# Altium PCB EEM_FMC_Carrier.PcbDoc (part 19 of 19)
Units mm, origin at the board's own origin, x right, y up, seen from the top; angles counter-clockwise.
Board outline 222.9 x 100 mm, 6 copper layers (TopLayer, MidLayer1, MidLayer2, SignalLayer1, Internal Plane 1, BottomLayer), stack 1.528 mm thick; 790 components, 743 nets, 3570 pads, 2277 vias.
Unrouted connection lines stored in the file: 3.
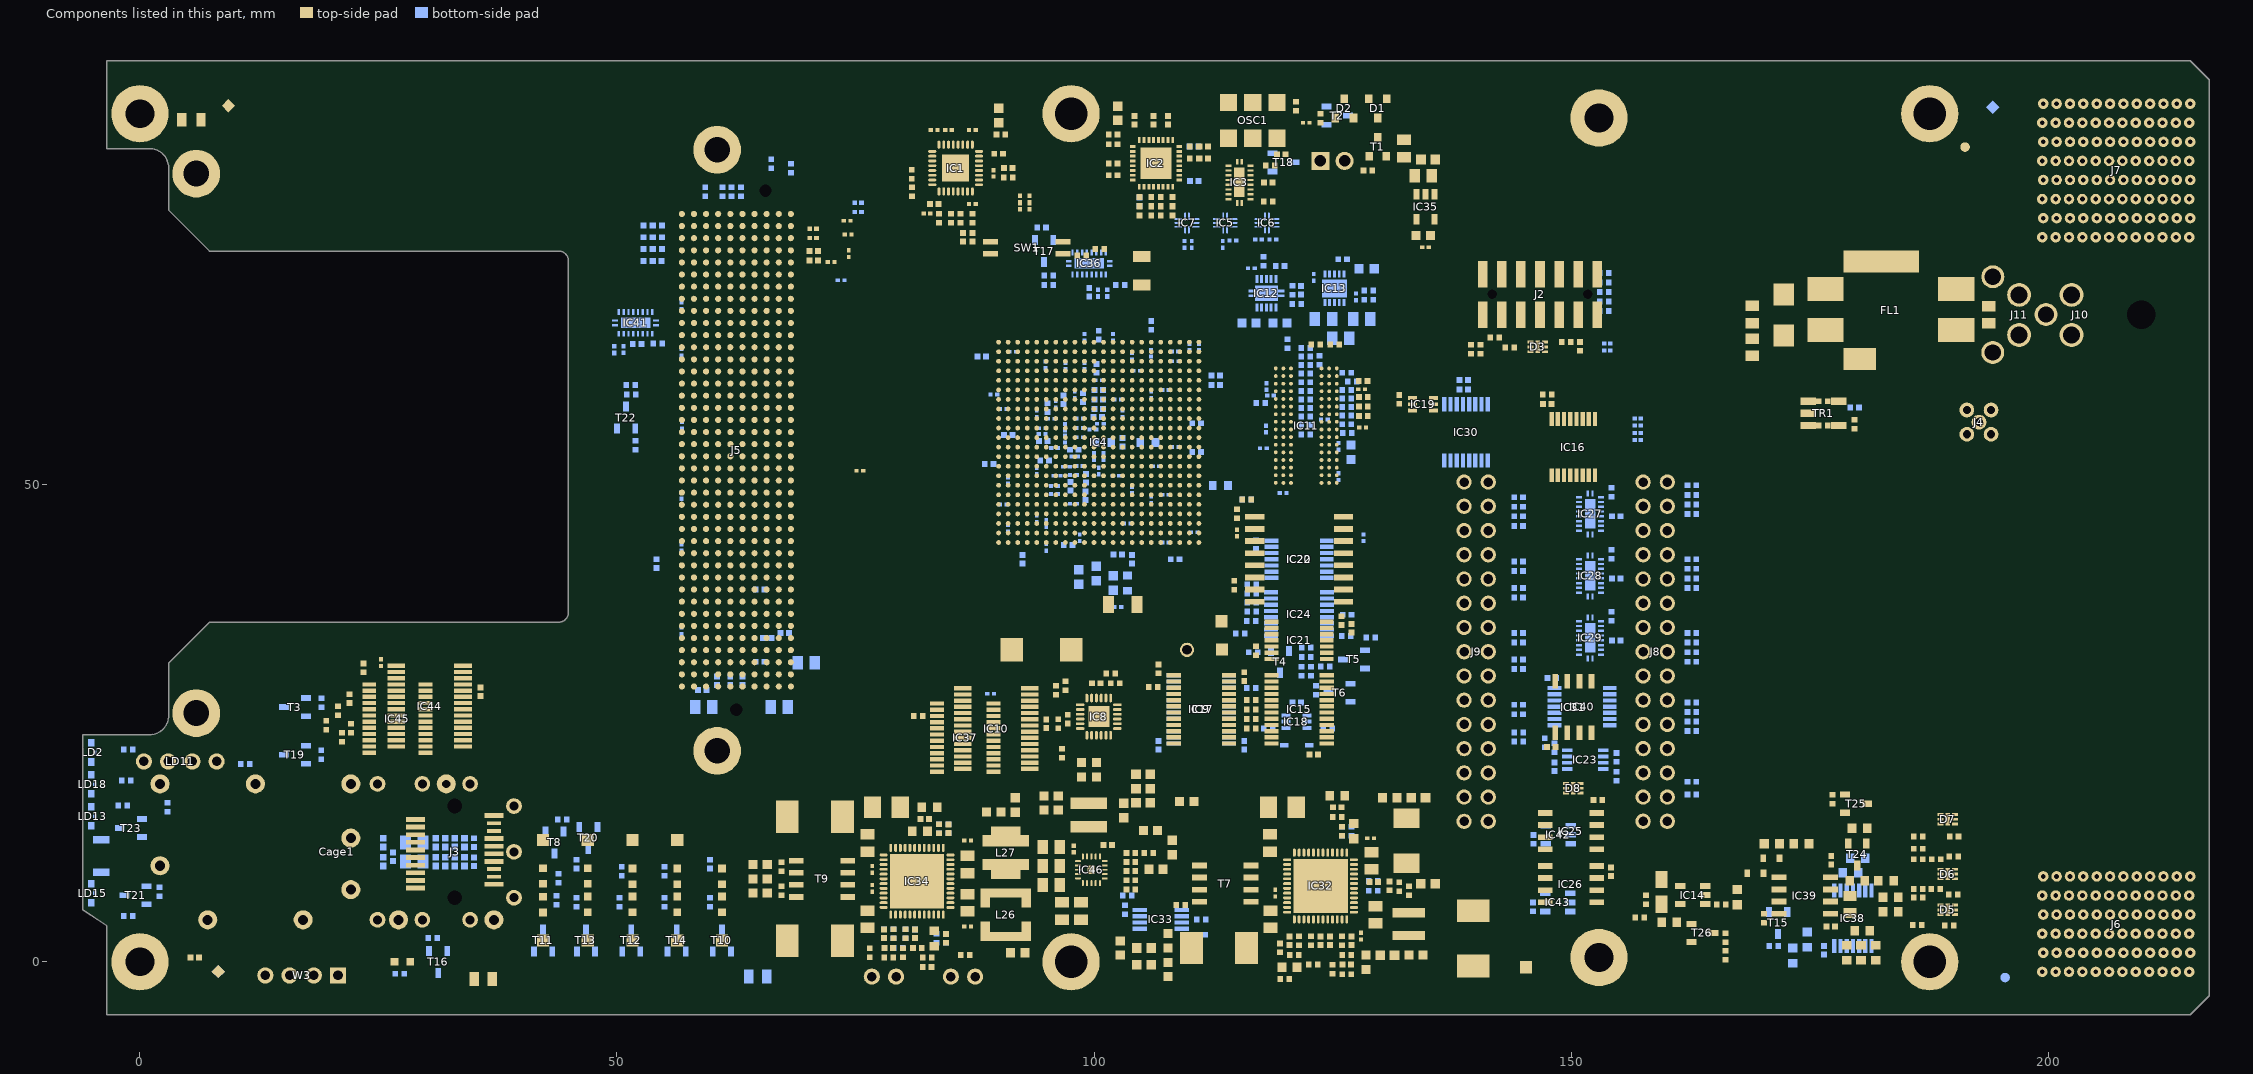
[diagram p21: the components of this part, seen from the top]

## Silkscreen, mask and mechanical layers (free items; w line width, h text height)
TopOverlay:
  drawing of 290 lines, arcs and shapes, not listed
  text "EEM FMC Carrier v1.2" at 20.681,81.884 h1.5
  text "WUT ISE 2025" at 29.366,79.196 h1.02
  text "Designed by Pawel Kulik" at 28.5,77.5 h0.6
  text "<-Off | On->" at 87.45,70.95 h1
  text "FPGA / JTAG" at 133.998,67.2 h1
  text "SW1  /  1 / Off / Off / On / On" at 71.75,62.25 h1
  text "2 / Off / On / Off / On" at 75.75,62.25 h1
  text "CLK SRC / BP / OSC / MMCX / N/C" at 79.5,62.25 h1
  text "INT CLK IN" at 195.825,56 h1
  text "EEM 0" at 158.05,55.625 h1
  text "EEM 1" at 139.575,55.6 h1
  text "SDA" at 114.7,35.85 h0.91
  text "SPI" at 114.85,33.5 h0.91
  text "GND" at 105.248,31.95 h1
  text "SCL" at 114.475,30.7 h0.9
  text "VADJ setting: / W1 shorted: 1.8V / W2 shorted: 2.5V / Both shorted: 3.3V / Both open: Not supported" at 74.55,29.525 h0.8
  text "Licensed under CERN-OHL-W v2 or later / https://ohwr.org/cernohl / https://github.com/sinara-hw/EEM_FMC_Carrier" at 53.551,27.227 h1.2 r90
  text "P3V3" at 56.812,14.2 h1 r90
  text "PGOOD / FMC" at 43.75,14 h1 r90
  text "VADJ / FMC" at 48.477,14 h1 r90
  text "P3V3 / FMC" at 53.165,14 h1 r90
  text "P12V0" at 61.7,14 h1 r90
  text "GND" at 11.398,0.8 h1
  text "TX" at 14.648,0.8 h1
  text "RX" at 17.398,0.8 h1
  text "P3V3" at 19.898,0.8 h1
  text "P12V0" at 143.475,0.625 h1
  text "FPGA DONE" at 29.75,-1.5 h1
  text "P1V0" at 43,-3 h1 r90
  text "P1V2" at 47.637,-3 h1 r90
  text "P1V5" at 52.325,-3 h1 r90
  text "P1V8" at 57.012,-3 h1 r90
  text "P2V5" at 61.77,-3 h1 r90
BottomOverlay:
  drawing of 262 lines, arcs and shapes, not listed
  text "EEM FMC Carrier v1.2" at 38.368,80.1 h1.5
  text "WUT ISE 2025" at 29.307,77.873 h1.02
  text "Licensed under CERN-OHL-W v2 or later / https://ohwr.org/cernohl / https://github.com/sinara-hw/EEM_FMC_Carrier" at 58.223,27.799 h1.2
TopSolder:
  rectangle: -2.379,-4.947 -0.202,-3.15
  rectangle: -0.202,-4.947 1.975,-3.175
  rectangle: 1.448,-4.947 216.417,-3.225
  region: 202.467,46.205 202.467,42.705 216.43,42.705 216.43,46.205
BottomSolder:
  rectangle: -2.379,-4.947 -0.202,-3.15
  rectangle: -0.202,-4.947 1.975,-3.175
  rectangle: 1.367,-4.947 216.417,-3.2
  region: 202.467,46.205 202.467,42.705 216.43,42.705 216.43,46.205
Mechanical 1:
  lines w0.15: 7.273,74.5 43.898,74.5 cw(c43.898,73.5) 44.898,73.5 44.898,36.6 cw(c43.898,36.6) 43.898,35.6 7.298,35.6 2.998,31.3 2.998,25.8 cw(c0.998,25.8) 0.998,23.8 -3.002,23.8 -6,23.8 -6,5.45 -3.5,3.8 -3.5,-5.55 214.9,-5.55 216.9,-3.55 216.9,92.45 214.9,94.45 -3.5,94.45 -3.5,85.25 0.998,85.25 cw(c0.998,83.25) 2.998,83.25 2.998,78.8 7.298,74.5
  lines w0.381: 50.863,111.387 61.275,111.387 87.176,111.387 109.014,111.387 125.52,111.387 139.994,111.387 151.93,111.387 ; 50.863,114.435 61.275,114.435 87.176,114.435 109.014,114.435 125.52,114.435 139.994,114.435 151.93,114.435 ; 50.863,117.483 61.275,117.483 87.176,117.483 109.014,117.483 125.52,117.483 139.994,117.483 151.93,117.483 ; 50.863,120.531 61.275,120.531 87.176,120.531 109.014,120.531 125.52,120.531 139.994,120.531 151.93,120.531 ; 50.863,123.579 61.275,123.579 87.176,123.579 109.014,123.579 125.52,123.579 139.994,123.579 151.93,123.579 ; 50.863,126.627 61.275,126.627 87.176,126.627 109.014,126.627 125.52,126.627 139.994,126.627 151.93,126.627 ; 50.863,129.675 61.275,129.675 87.176,129.675 109.014,129.675 125.52,129.675 139.994,129.675 151.93,129.675 ; 50.863,132.723 61.275,132.723 87.176,132.723 109.014,132.723 125.52,132.723 139.994,132.723 151.93,132.723 ; 50.863,135.771 61.275,135.771 87.176,135.771 109.014,135.771 125.52,135.771 139.994,135.771 151.93,135.771 ; 50.863,138.819 61.275,138.819 87.176,138.819 109.014,138.819 125.52,138.819 139.994,138.819 151.93,138.819 ; 50.863,141.867 61.275,141.867 87.176,141.867 109.014,141.867 125.52,141.867 139.994,141.867 151.93,141.867 ; 50.863,144.915 61.275,144.915 87.176,144.915 109.014,144.915 125.52,144.915 139.994,144.915 151.93,144.915 ; 50.863,147.963 61.275,147.963 87.176,147.963 109.014,147.963 125.52,147.963 139.994,147.963 151.93,147.963 ; 50.863,151.011 61.275,151.011 87.176,151.011 109.014,151.011 125.52,151.011 139.994,151.011 151.93,151.011 ; 50.863,154.059 151.93,154.059 ; 61.275,157.107 61.275,108.339 ; 87.176,157.107 87.176,108.339 ; 109.014,157.107 109.014,108.339 ; 125.52,157.107 125.52,108.339 ; 139.994,157.107 139.994,108.339 ; 61.275,108.339 87.176,108.339 ; 61.275,108.339 50.863,108.339 50.863,157.107 151.93,157.107 151.93,108.339 139.994,108.339 ; 87.176,108.339 109.014,108.339 ; 109.014,108.339 125.52,108.339 ; 125.52,108.339 139.994,108.339
  text "Layer" at 52.641,154.821 h1.52
  text "Name" at 63.053,154.821 h1.52
  text "Material" at 88.954,154.821 h1.52
  text "Thickness" at 110.792,154.821 h1.52
  text "Constant" at 127.298,154.821 h1.52
  text "Gerber" at 141.772,154.821 h1.52
  text "TopOverlay" at 63.053,151.773 h1.52
  text "GTO" at 141.772,151.773 h1.52
  text "TopSolder" at 63.053,148.725 h1.52
  text "Solder Resist" at 88.954,148.725 h1.52
  text "0.022mm" at 110.792,148.725 h1.52
  text "3.5" at 127.298,148.725 h1.52
  text "GTS" at 141.772,148.725 h1.52
  text "1" at 52.641,145.677 h1.52
  text "TopLayer" at 63.053,145.677 h1.52
  text "0.053mm" at 110.792,145.677 h1.52
  text "GTL" at 141.772,145.677 h1.52
  text "Dielectric1" at 63.053,142.629 h1.52
  text "FR-4" at 88.954,142.629 h1.52
  text "0.110mm" at 110.792,142.629 h1.52
  text "4.2" at 127.298,142.629 h1.52
  text "2" at 52.641,139.581 h1.52
  text "MidLayer1" at 63.053,139.581 h1.52
  text "0.018mm" at 110.792,139.581 h1.52
  text "G1" at 141.772,139.581 h1.52
  text "Dielectric2" at 63.053,136.533 h1.52
  text "FR-4" at 88.954,136.533 h1.52
  text "0.200mm" at 110.792,136.533 h1.52
  text "4.2" at 127.298,136.533 h1.52
  text "3" at 52.641,133.485 h1.52
  text "MidLayer2" at 63.053,133.485 h1.52
  text "0.018mm" at 110.792,133.485 h1.52
  text "G2" at 141.772,133.485 h1.52
  text "Dielectric3" at 63.053,130.437 h1.52
  text "FR-4" at 88.954,130.437 h1.52
  text "0.730mm" at 110.792,130.437 h1.52
  text "4.2" at 127.298,130.437 h1.52
  text "4" at 52.641,127.389 h1.52
  text "SignalLayer1" at 63.053,127.389 h1.52
  text "0.018mm" at 110.792,127.389 h1.52
  text "G3" at 141.772,127.389 h1.52
  text "Dielectric4" at 63.053,124.341 h1.52
  text "FR-4" at 88.954,124.341 h1.52
  text "0.200mm" at 110.792,124.341 h1.52
  text "4.2" at 127.298,124.341 h1.52
  text "5" at 52.641,121.293 h1.52
  text "Internal Plane 1" at 63.053,121.293 h1.52
  text "0.018mm" at 110.792,121.293 h1.52
  text "GP1" at 141.772,121.293 h1.52
  text "Dielectric5" at 63.053,118.245 h1.52
  text "FR-4" at 88.954,118.245 h1.52
  text "0.110mm" at 110.792,118.245 h1.52
  text "4.2" at 127.298,118.245 h1.52
  text "6" at 52.641,115.197 h1.52
  text "BottomLayer" at 63.053,115.197 h1.52
  text "0.053mm" at 110.792,115.197 h1.52
  text "GBL" at 141.772,115.197 h1.52
  text "BottomSolder" at 63.053,112.149 h1.52
  text "Solder Resist" at 88.954,112.149 h1.52
  text "0.022mm" at 110.792,112.149 h1.52
  text "3.5" at 127.298,112.149 h1.52
  text "GBS" at 141.772,112.149 h1.52
  text "BottomOverlay" at 63.053,109.101 h1.52
  text "GBO" at 141.772,109.101 h1.52
  text "Total board thickness:" at 52.641,106.053 h1.52
  text "1.572mm" at 110.792,106.053 h1.52
  text "All vias must be fileld with resin and capped with copper" at 45.138,101.546 h3
Mechanical 2:
  lines w0.1: -6.114,-19.788 -6.114,102.894
Mechanical 13:
  lines w0.01: -6.352,-6.334 -6.352,75.374
Mechanical 15:
  lines w0.1: 87.498,39.2 113.498,39.2 113.498,69.7 87.498,69.7 87.498,39.2
Mechanical 17:
  drawing of 154 lines, arcs and shapes, not listed

## Text inside footprints (layer, text, board x,y; h text height)
Cage1: Drill Drawing "1x diam. 0.85mm +/-0.05" at 1.6,16.025 h1; Drill Drawing "9x diam. 0.95mm +/-0.05" at 1.4,11.925 h1; Drill Drawing "10x diam. 1.05mm +/-0.05" at 0.8,14.15 h1; Drill Drawing "PRESS-FIT TECHNOLOGY" at 3.6,9.725 h1
IC11: Mechanical 14 "L" at 126.848,58.4 h0.4 r180; Mechanical 14 "K" at 126.848,57.6 h0.4 r180; Mechanical 14 "M" at 126.848,59.2 h0.4 r180; Mechanical 14 "H" at 126.848,56 h0.4 r180; Mechanical 14 "G" at 126.848,55.2 h0.4 r180; Mechanical 14 "F" at 126.848,54.4 h0.4 r180; Mechanical 14 "E" at 126.848,53.6 h0.4 r180; Mechanical 14 "D" at 126.848,52.8 h0.4 r180; Mechanical 14 "C" at 126.848,52 h0.4 r180; Mechanical 14 "B" at 126.848,51.2 h0.4 r180; Mechanical 14 "N" at 126.848,60 h0.4 r180; Mechanical 14 "P" at 126.848,60.8 h0.4 r180; Mechanical 14 "R" at 126.848,61.6 h0.4 r180; Mechanical 14 "J" at 126.848,56.8 h0.4 r180; Mechanical 14 "T" at 126.848,62.4 h0.4 r180; Mechanical 14 "1" at 125.573,48.925 h0.4 r180; Mechanical 14 "2" at 124.773,48.925 h0.4 r180; Mechanical 14 "3" at 123.973,48.925 h0.4 r180; Mechanical 14 "7" at 120.773,48.925 h0.4 r180; Mechanical 14 "8" at 119.973,48.925 h0.4 r180; Mechanical 14 "9" at 119.173,48.925 h0.4 r180
J1: TopOverlay "1" at 123.508,85.348 h1; Mechanical 14 "1" at 123.508,85.348 h1
J5: TopOverlay "1" at 69.951,78.914 h1 r180; TopOverlay "40" at 67.974,27.335 h1.2 r180; TopOverlay "k" at 56.997,83.613 h1 r180; TopOverlay "j" at 58.248,83.125 h1 r180; TopOverlay "g" at 60.923,88.55 h1 r180; TopOverlay "h" at 59.598,88.8 h1 r180; TopOverlay "f" at 62.073,88.625 h1 r180; TopOverlay "a" at 68.609,83.596 h1 r180; TopOverlay "b" at 67.339,83.596 h1 r180; TopOverlay "c" at 66.069,83.596 h1 r180; TopOverlay "d" at 64.905,83.613 h1 r180; TopOverlay "e" at 63.349,83.573 h1 r180; Mechanical 14 "1" at 69.951,78.914 h1 r180; Mechanical 14 "40" at 67.974,27.335 h1.2 r180; Mechanical 14 "k" at 56.997,83.613 h1 r180; Mechanical 14 "j" at 58.267,83.613 h1 r180; Mechanical 14 "g" at 60.934,83.486 h1 r180; Mechanical 14 "h" at 59.592,83.596 h1 r180; Mechanical 14 "f" at 62.077,83.74 h1 r180; Mechanical 14 "e" at 63.349,83.573 h1 r180; Mechanical 14 "d" at 64.905,83.613 h1 r180; Mechanical 14 "c" at 66.069,83.596 h1 r180; Mechanical 14 "b" at 67.339,83.596 h1 r180; Mechanical 14 "a" at 68.609,83.596 h1 r180
J6: TopOverlay "6" at 194.85,8.6 h1 r90; TopOverlay "5" at 194.85,6.6 h1 r90; TopOverlay "4" at 194.85,4.6 h1 r90; TopOverlay "3" at 194.85,2.6 h1 r90; TopOverlay "2" at 194.85,0.6 h1 r90; TopOverlay "1" at 194.85,-1.4 h1 r90; TopOverlay "L" at 199.9,-3.25 h1 r90; TopOverlay "K" at 201.3,-3.25 h1 r90; TopOverlay "J" at 202.7,-3.25 h1 r90; TopOverlay "I" at 204.1,-3 h1 r90; TopOverlay "H" at 205.5,-3.25 h1 r90; TopOverlay "G" at 206.9,-3.25 h1 r90; TopOverlay "F" at 208.3,-3.25 h1 r90; TopOverlay "E" at 209.7,-3.25 h1 r90; TopOverlay "D" at 211.1,-3.25 h1 r90; TopOverlay "C" at 212.5,-4.25 h1 r90; TopOverlay "B" at 213.9,-4.25 h1 r90; TopOverlay "A" at 215.3,-4.25 h1 r90; Drill Drawing "Diam. 0.5mm +/-0.05" at 215.55,12.95 h1 r180; Drill Drawing "PRESS-FIT TECHNOLOGY" at 215.55,11.45 h1 r180; Mechanical 14 "6" at 194.85,8.6 h1 r90; Mechanical 14 "5" at 194.85,6.6 h1 r90; Mechanical 14 "4" at 194.85,4.6 h1 r90; Mechanical 14 "3" at 194.85,2.6 h1 r90; Mechanical 14 "2" at 194.85,0.6 h1 r90; Mechanical 14 "1" at 194.85,-1.4 h1 r90; Mechanical 14 "L" at 199.9,-3.25 h1 r90; Mechanical 14 "K" at 201.3,-3.25 h1 r90; Mechanical 14 "J" at 202.7,-3.25 h1 r90; Mechanical 14 "I" at 204.1,-3 h1 r90; Mechanical 14 "H" at 205.5,-3.25 h1 r90; Mechanical 14 "G" at 206.9,-3.25 h1 r90; Mechanical 14 "F" at 208.3,-3.25 h1 r90; Mechanical 14 "E" at 209.7,-3.25 h1 r90; Mechanical 14 "D" at 211.1,-3.25 h1 r90; Mechanical 14 "C" at 212.5,-4.25 h1 r90; Mechanical 14 "B" at 213.9,-4.25 h1 r90; Mechanical 14 "A" at 215.3,-4.25 h1 r90; Mechanical 8 "Edge of Daugher Card" at 217.65,0.725 h0.5 r90; Mechanical 8 "Top Surface of Mother Board" at 229.15,-0.425 h0.5 r90
J7: TopOverlay "7" at 194.85,87.6 h1 r90; TopOverlay "8" at 194.85,89.6 h1 r90; TopOverlay "6" at 194.85,85.6 h1 r90; TopOverlay "5" at 194.85,83.6 h1 r90; TopOverlay "4" at 194.85,81.6 h1 r90; TopOverlay "3" at 194.85,79.6 h1 r90; TopOverlay "2" at 194.85,77.6 h1 r90; TopOverlay "1" at 194.85,75.6 h1 r90; TopOverlay "L" at 199.9,73.75 h1 r90; TopOverlay "K" at 201.3,73.75 h1 r90; TopOverlay "J" at 202.7,73.75 h1 r90; TopOverlay "I" at 204.1,74 h1 r90; TopOverlay "H" at 205.5,73.75 h1 r90; TopOverlay "G" at 206.9,73.75 h1 r90; TopOverlay "F" at 208.3,73.75 h1 r90; TopOverlay "E" at 209.7,73.75 h1 r90; TopOverlay "D" at 211.1,73.75 h1 r90; TopOverlay "C" at 212.5,72.75 h1 r90; TopOverlay "B" at 213.9,72.75 h1 r90; TopOverlay "A" at 215.3,72.75 h1 r90; Drill Drawing "Diam. 0.5mm +/-0.05" at 215.55,93.95 h1 r180; Drill Drawing "PRESS-FIT TECHNOLOGY" at 215.55,92.45 h1 r180; Mechanical 14 "7" at 194.85,87.6 h1 r90; Mechanical 14 "8" at 194.85,89.6 h1 r90; Mechanical 14 "6" at 194.85,85.6 h1 r90; Mechanical 14 "5" at 194.85,83.6 h1 r90; Mechanical 14 "4" at 194.85,81.6 h1 r90; Mechanical 14 "3" at 194.85,79.6 h1 r90; Mechanical 14 "2" at 194.85,77.6 h1 r90; Mechanical 14 "1" at 194.85,75.6 h1 r90; Mechanical 14 "L" at 199.9,73.75 h1 r90; Mechanical 14 "K" at 201.3,73.75 h1 r90; Mechanical 14 "J" at 202.7,73.75 h1 r90; Mechanical 14 "I" at 204.1,74 h1 r90; Mechanical 14 "H" at 205.5,73.75 h1 r90; Mechanical 14 "G" at 206.9,73.75 h1 r90; Mechanical 14 "F" at 208.3,73.75 h1 r90; Mechanical 14 "E" at 209.7,73.75 h1 r90; Mechanical 14 "D" at 211.1,73.75 h1 r90; Mechanical 14 "C" at 212.5,72.75 h1 r90; Mechanical 14 "B" at 213.9,72.75 h1 r90; Mechanical 14 "A" at 215.3,72.75 h1 r90; Mechanical 8 "Edge of Daugher Card" at 217.65,79.725 h0.5 r90; Mechanical 8 "Top Surface of Mother Board" at 229.15,78.575 h0.5 r90
J8: TopOverlay "30" at 161.495,15.362 h1.02 r270; Mechanical 14 "30" at 161.495,15.362 h1.02 r270
J9: TopOverlay "30" at 142.725,15.361 h1.02 r270; Mechanical 14 "30" at 142.725,15.361 h1.02 r270
J10: TopOverlay "1" at 201.515,72.284 h1.2 r270; Mechanical 14 "1" at 201.515,72.284 h1.2 r270
J11: Mechanical 8 "CENTER PIN" at 199.713,64.144 h0.5 r180; Mechanical 8 "SLEEVE SHUNT" at 200.813,72.069 h0.5 r180; Mechanical 8 "2.5mm" at 209.788,64.544 h1 r90
SW1: TopOverlay "ON" at 94.209,76.124 h1 r270; TopOverlay "2" at 90.653,74.473 h1 r270; TopOverlay "1" at 90.653,75.743 h1 r270; Mechanical 14 "ON" at 94.219,76.124 h1 r270; Mechanical 14 "2" at 90.663,74.473 h1 r270; Mechanical 14 "1" at 90.663,75.743 h1 r270